# Altium PCB dual_drive_lessgooo.PcbDoc
Units mil, origin at the board's own origin, x right, y up, seen from the top; angles counter-clockwise.
Board outline 6000 x 4000 mil, 2 copper layers (Top Layer, Bottom Layer); 1 components, 2 nets, 8 pads, 0 vias.
Unrouted connection lines stored in the file: 2.
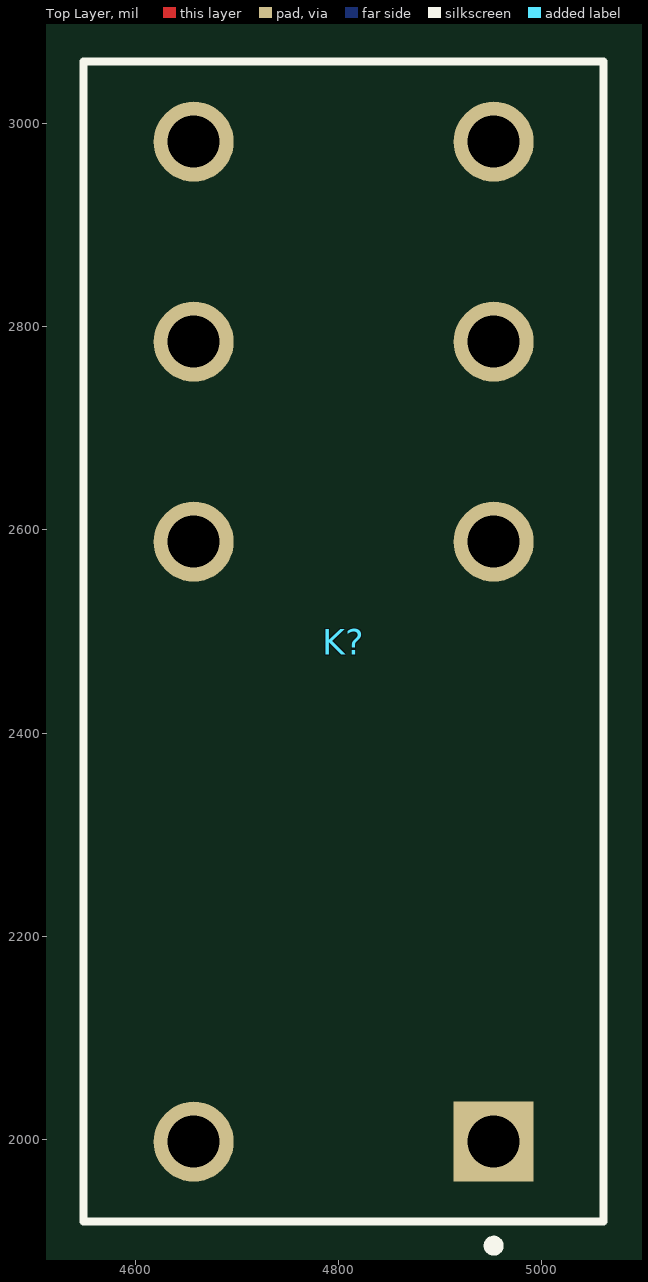
[diagram p0: Top Layer view]
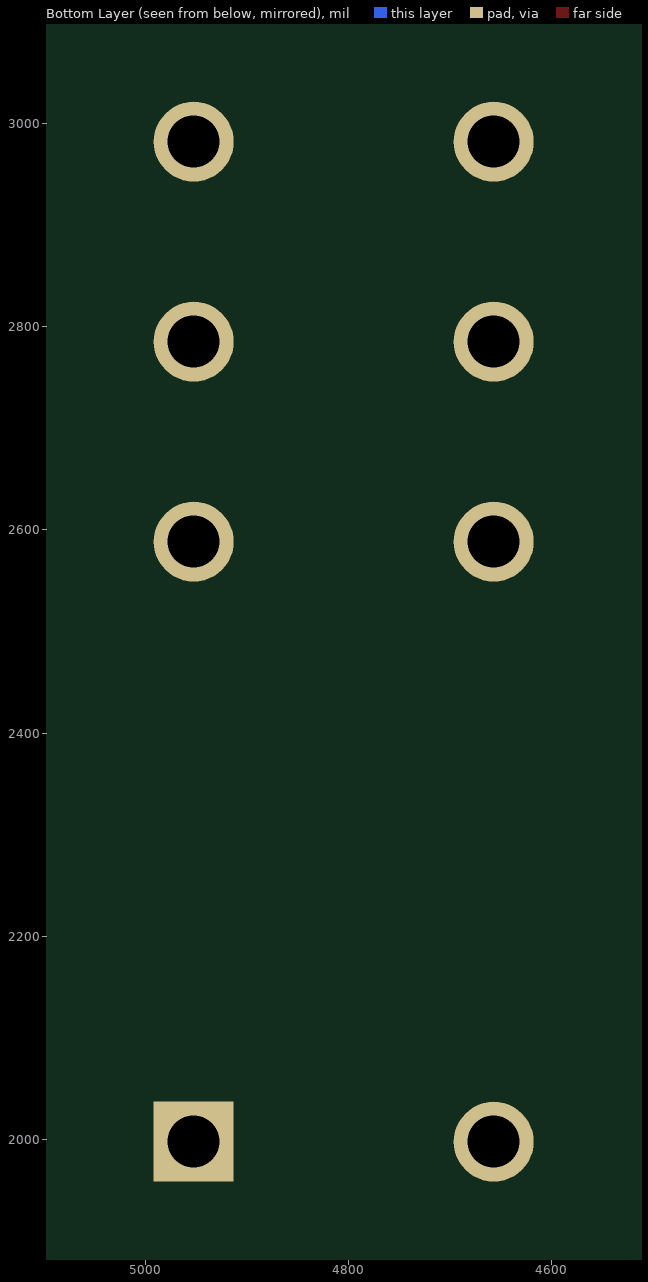
[diagram p1: Bottom Layer view, seen from below]

## Layer stack, top to bottom
Top Solder: solder mask 0.4, Solder Resist, Dk 3.5
Top Layer: signal copper 1.4
Dielectric 1: dielectric 12.6, FR-4, Dk 4.8
Bottom Layer: signal copper 1.4
Bottom Solder: solder mask 0.4, Solder Resist, Dk 3.5

## Board outline
1000,1000 7000,1000 7000,5000 1000,5000

## Design rules (kind name [scope] priority, off if disabled: settings)
Clearance [All] p1: gap=10 ignorepadtopadclearanceinfootprint=FALSE
PolygonConnect [All] p1: connectstyle=Relief reliefconductorwidth=10 reliefentries=4 polygonreliefangle="90 Angle" airgapwidth=10
RoutingVias [All] p1: holewidth=28 width=50 viastyle="Through Hole" minholewidth=28 minwidth=50 maxholewidth=28 maxwidth=50
SolderMaskExpansion [All] p1: expansion=0 istentingtop=FALSE
Width [All] p1: maxlimit=10 minlimit=10 preferedwidth=10
30 further rules are at their usual default settings.

## Components (designator, comment, footprint, x,y, rotation, side; value= is the part's Value field where it differs from the comment)
K? "G2R-2-DC110" FP-G2R-2-DC110-MFG 4805,2490 r90 top

## Footprints (in the part's own frame and the unit in brackets; to place one, negate y for a bottom-side part, rotate by r counter-clockwise, add the part's x,y. Pads: shape width x height; smd on the part's side, far side on the other; paste and mask are expansions set on the pad)
FP-G2R-2-DC110-MFG [mm]
  rect 2x2 hole 1.3 paste-2539.97 mask+0: 1(-12.5,-3.75)
  round 2 hole 1.3 paste-2539.97 mask+0: 2(2.5,-3.75) 3(7.5,-3.75) 4(12.5,-3.75) 5(12.5,3.75) 6(7.5,3.75) 7(2.5,3.75) 8(-12.5,3.75)
  silkscreen extent -15.22,-6.5 14.5,6.5, body extent -14.6,-6.6 14.6,6.6, height 0.25

## Part data
K?: library part CMP-08822-000193-1, "RELAY GEN PURPOSE DPDT 5A 110V", Coil Current=4.8mA, Coil Power=530mW, Coil Resistance=22.9kR, Coil Voltage (DC)=110V, Contact Current Rating=5A, Max Operating Temperature=70°C, Max Voltage Rating (AC)=380V, Max Voltage Rating (DC)=125V, Min Operating Temperature=-40°C, Package Quantity=100, Coil Type=Non-Latching, Contact Material=Silver, Lead Free="Lead Free", Max Current Rating=5A, Mount="Through Hole", Number of Pins=8, Operate Time=15ms, Packaging=Tray, Relay Type="General Purpose", Release Time=5ms, RoHS Compliant=Yes, Series=G2R, Termination="PC Pin", Throw Configuration=DPDT

## Nets (pads, with @x,y where several pads share a name; then routed paths per layer and width w, separated by ;. In a path a pad name is that pad's centre, name@x,y a point inside that pad or via, vN(x,y) a via of type N, cw(c..) or ccw(c..) an arc to the next point about the centre after c; other vN are vias at no path point)
A: K?.4 K?.5
NetK?_2: K?.2 K?.7
pads on no net: K?.1 K?.3 K?.6 K?.8